# EAGLE board Stunning Amur-Turing (EAGLE 9.7.0)

Size 333.93 x 124.19 mm. Coordinates in mm from the lower left corner, seen from the top.
Outline: 0,0 333.93,0 333.93,124.19 0,124.19 0,0
Copper layers (1*16): Top 0.035mm / dielectric 1.5mm / Bottom 0.035mm
Design rules "default": minimum track width 6mil, minimum drill 0.35mm, track to track 6mil, track to pad 6mil, pad to pad 6mil, via to via 6mil, smd to smd 6mil, copper to edge 40mil, drill to drill 6mil, minimum pad ring 10mil, minimum via ring 8mil, stop-mask expansion 4mil, vias tented up to drill 0mil, thermal gap 10mil

## Footprints (pad centres in the part's own frame; a part is rotated, then mirrored left to right if it is on the bottom)
LEDRD254W60D565H860B = drill 0.981 pad 1.581: 1 -1.27,0; 2 1.27,0
LEDRD254W60D565H860B_G = drill 0.981 pad 1.581: 1 -1.27,0; 2 1.27,0
LEDRD254W60D565H860B_B = drill 0.981 pad 1.581: 1 -1.27,0; 2 1.27,0
LEDRD254W60D565H860B_Y = drill 0.981 pad 1.581: 1 -1.27,0; 2 1.27,0
DIODE-AXIAL = drill 1: 1 -5.08,0; 2 5.08,0
HC-SR04 = drill 1.016 long: 1 -3.81,0; 2 -1.27,0; 3 1.27,0; 4 3.81,0
MOTOR = drill 1.118 pad 3.15 octagon: + 2.54,0; - -2.54,0
RESAD1016W63L850D250B = drill 0.83 pad 1.43: 1 -5.08,0; 2 5.08,0
TO92 = drill 0.813 octagon: 1 -1.27,0; 2 0,1.905; 3 1.27,0
ARDUINO-UNO-R3-SHIELD = drill 1.016 pad 1.88: 3.3V 24.13,-2.54; 5V 24.13,0; A0 24.13,12.7; A1 24.13,15.24; A2 24.13,17.78; A3 24.13,20.32; A4 24.13,22.86; A5 24.13,25.4; AREF -24.13,-13.97; D2 -24.13,20.32; D3 -24.13,17.78; D4 -24.13,15.24; D5 -24.13,12.7; D6 -24.13,10.16; D7 -24.13,7.62; D8 -24.13,3.81; D9 -24.13,1.27; D10 -24.13,-1.27; D11 -24.13,-3.81; D12 -24.13,-6.35; D13 -24.13,-8.89; GND@0 24.13,2.54; GND@1 24.13,5.08; GND@2 -24.13,-11.43; IOREF 24.13,-7.62; NC 24.13,-10.16; RES 24.13,-5.08; RX -24.13,25.4; SCL -24.13,-19.05; SDA -24.13,-16.51; TX -24.13,22.86; VIN 24.13,7.62
LCD-I2C = drill 1.016 long: 1 -19.05,-5.08; 2 -19.05,-7.62; 3 -19.05,-10.16; 4 -19.05,-12.7

## Placement (x,y rotation side)
D1  RED  [LEDRD254W60D565H860B]  221.09,38.97 0 top
D2  GREEN  [LEDRD254W60D565H860B_G]  198.53,39.06 0 top
D3  BLUE  [LEDRD254W60D565H860B_B]  213.79,38.84 0 top
D4  YELLOW  [LEDRD254W60D565H860B_Y]  206.36,38.33 0 top
D5  DIODEDIODE-AXIAL  [DIODE-AXIAL]  324.93,114.53 180 top
DISTSENSOR  DISTANCE-SENSOR-4PINHC-SR04  [HC-SR04]  207.08,96.53 0 top
MVENTOINHA_IMPROVISADA  MOTOR_HDR  [MOTOR]  300.57,114.52 0 top
R1  220  [RESAD1016W63L850D250B]  287.6,75.14 180 top
R2  220  [RESAD1016W63L850D250B]  170.74,66.01 0 top
R3  220  [RESAD1016W63L850D250B]  171,61.04 0 top
R4  10k  [RESAD1016W63L850D250B]  240.09,51.45 90 top
R7  220  [RESAD1016W63L850D250B]  170.74,54.51 0 top
R8  220  [RESAD1016W63L850D250B]  170.48,48.49 0 top
TTRANSISTOR  NPN  [TO92]  310.75,80.91 0 top
U1  ARDUINO-UNO-R3-SHIELD  [ARDUINO-UNO-R3-SHIELD]  127.79,76.31 180 top
U2  LCD-16X2-I2CSUNFOUNDER-IIC  [LCD-I2C]  30.73,36.63 0 top

## Library data of the parts
D1 = Tinkercad; CATEGORY: Opto-Electronic; SUB-CATEGORY: LED; VALUE: LED_RED
D2 = Tinkercad; CATEGORY: Opto-Electronic; SUB-CATEGORY: LED; VALUE: LED_GREEN
D3 = Tinkercad; CATEGORY: Opto-Electronic; SUB-CATEGORY: LED; VALUE: LED_BLUE
D4 = Tinkercad; CATEGORY: Opto-Electronic; SUB-CATEGORY: LED; VALUE: LED_YELLOW
D5 DISTSENSOR MVENTOINHA_IMPROVISADA R1-R4 R7 R8 U1 U2 = Tinkercad
TTRANSISTOR = Tinkercad; CATEGORY: Transistor; SUB-CATEGORY: BJT; TYPE: NPN

## Nets
D1_A: D1.1 R2.2
D2_A: D2.1 R8.2
D3_A: D3.1 R3.2
D4_A: D4.1 R7.2
MVENTOINHA_IMPROVISADA_-: D5.1 MVENTOINHA_IMPROVISADA.- TTRANSISTOR.1
TTRANSISTOR_B: R1.1 R4.2 TTRANSISTOR.2
U1_5V: D5.2 DISTSENSOR.1 MVENTOINHA_IMPROVISADA.+ U1.5V U2.2
U1_A4: U1.A4 U2.3
U1_A5: U1.A5 U2.4
U1_D2: R8.1 U1.D2
U1_D3: R7.1 U1.D3
U1_D4: R3.1 U1.D4
U1_D5: R2.1 U1.D5
U1_D7: DISTSENSOR.2 U1.D7
U1_D8: DISTSENSOR.3 U1.D8
U1_D9: R1.2 U1.D9
U1_GND: D1.2 D2.2 D3.2 D4.2 DISTSENSOR.4 R4.1 TTRANSISTOR.3 U1.GND@0 U1.GND@1 U1.GND@2 U2.1

## Tracks (layer width: path | path; a pad name or v marks a point on that pad's centre or on a via)
D1_A  (1 unrouted)
D2_A  (1 unrouted)
D3_A  (1 unrouted)
D4_A  (1 unrouted)
MVENTOINHA_IMPROVISADA_-  (2 unrouted)
TTRANSISTOR_B  (2 unrouted)
U1_5V  (4 unrouted)
U1_A4  (1 unrouted)
U1_A5  (1 unrouted)
U1_D2  (1 unrouted)
U1_D3  (1 unrouted)
U1_D4  (1 unrouted)
U1_D5  (1 unrouted)
U1_D7  (1 unrouted)
U1_D8  (1 unrouted)
U1_D9  (1 unrouted)
U1_GND  (10 unrouted)